# Altium PCB Hexapod_PCB.PcbDoc (part 2 of 2)
Units mm, origin at the board's own origin, x right, y up, seen from the top; angles counter-clockwise.
Board outline 100 x 100 mm, 4 copper layers (Top Layer, GND Layer, PWR Layer, Bottom Layer), stack 1.483 mm thick; 251 components, 159 nets, 831 pads, 257 vias.
Unrouted connection lines stored in the file: 253.
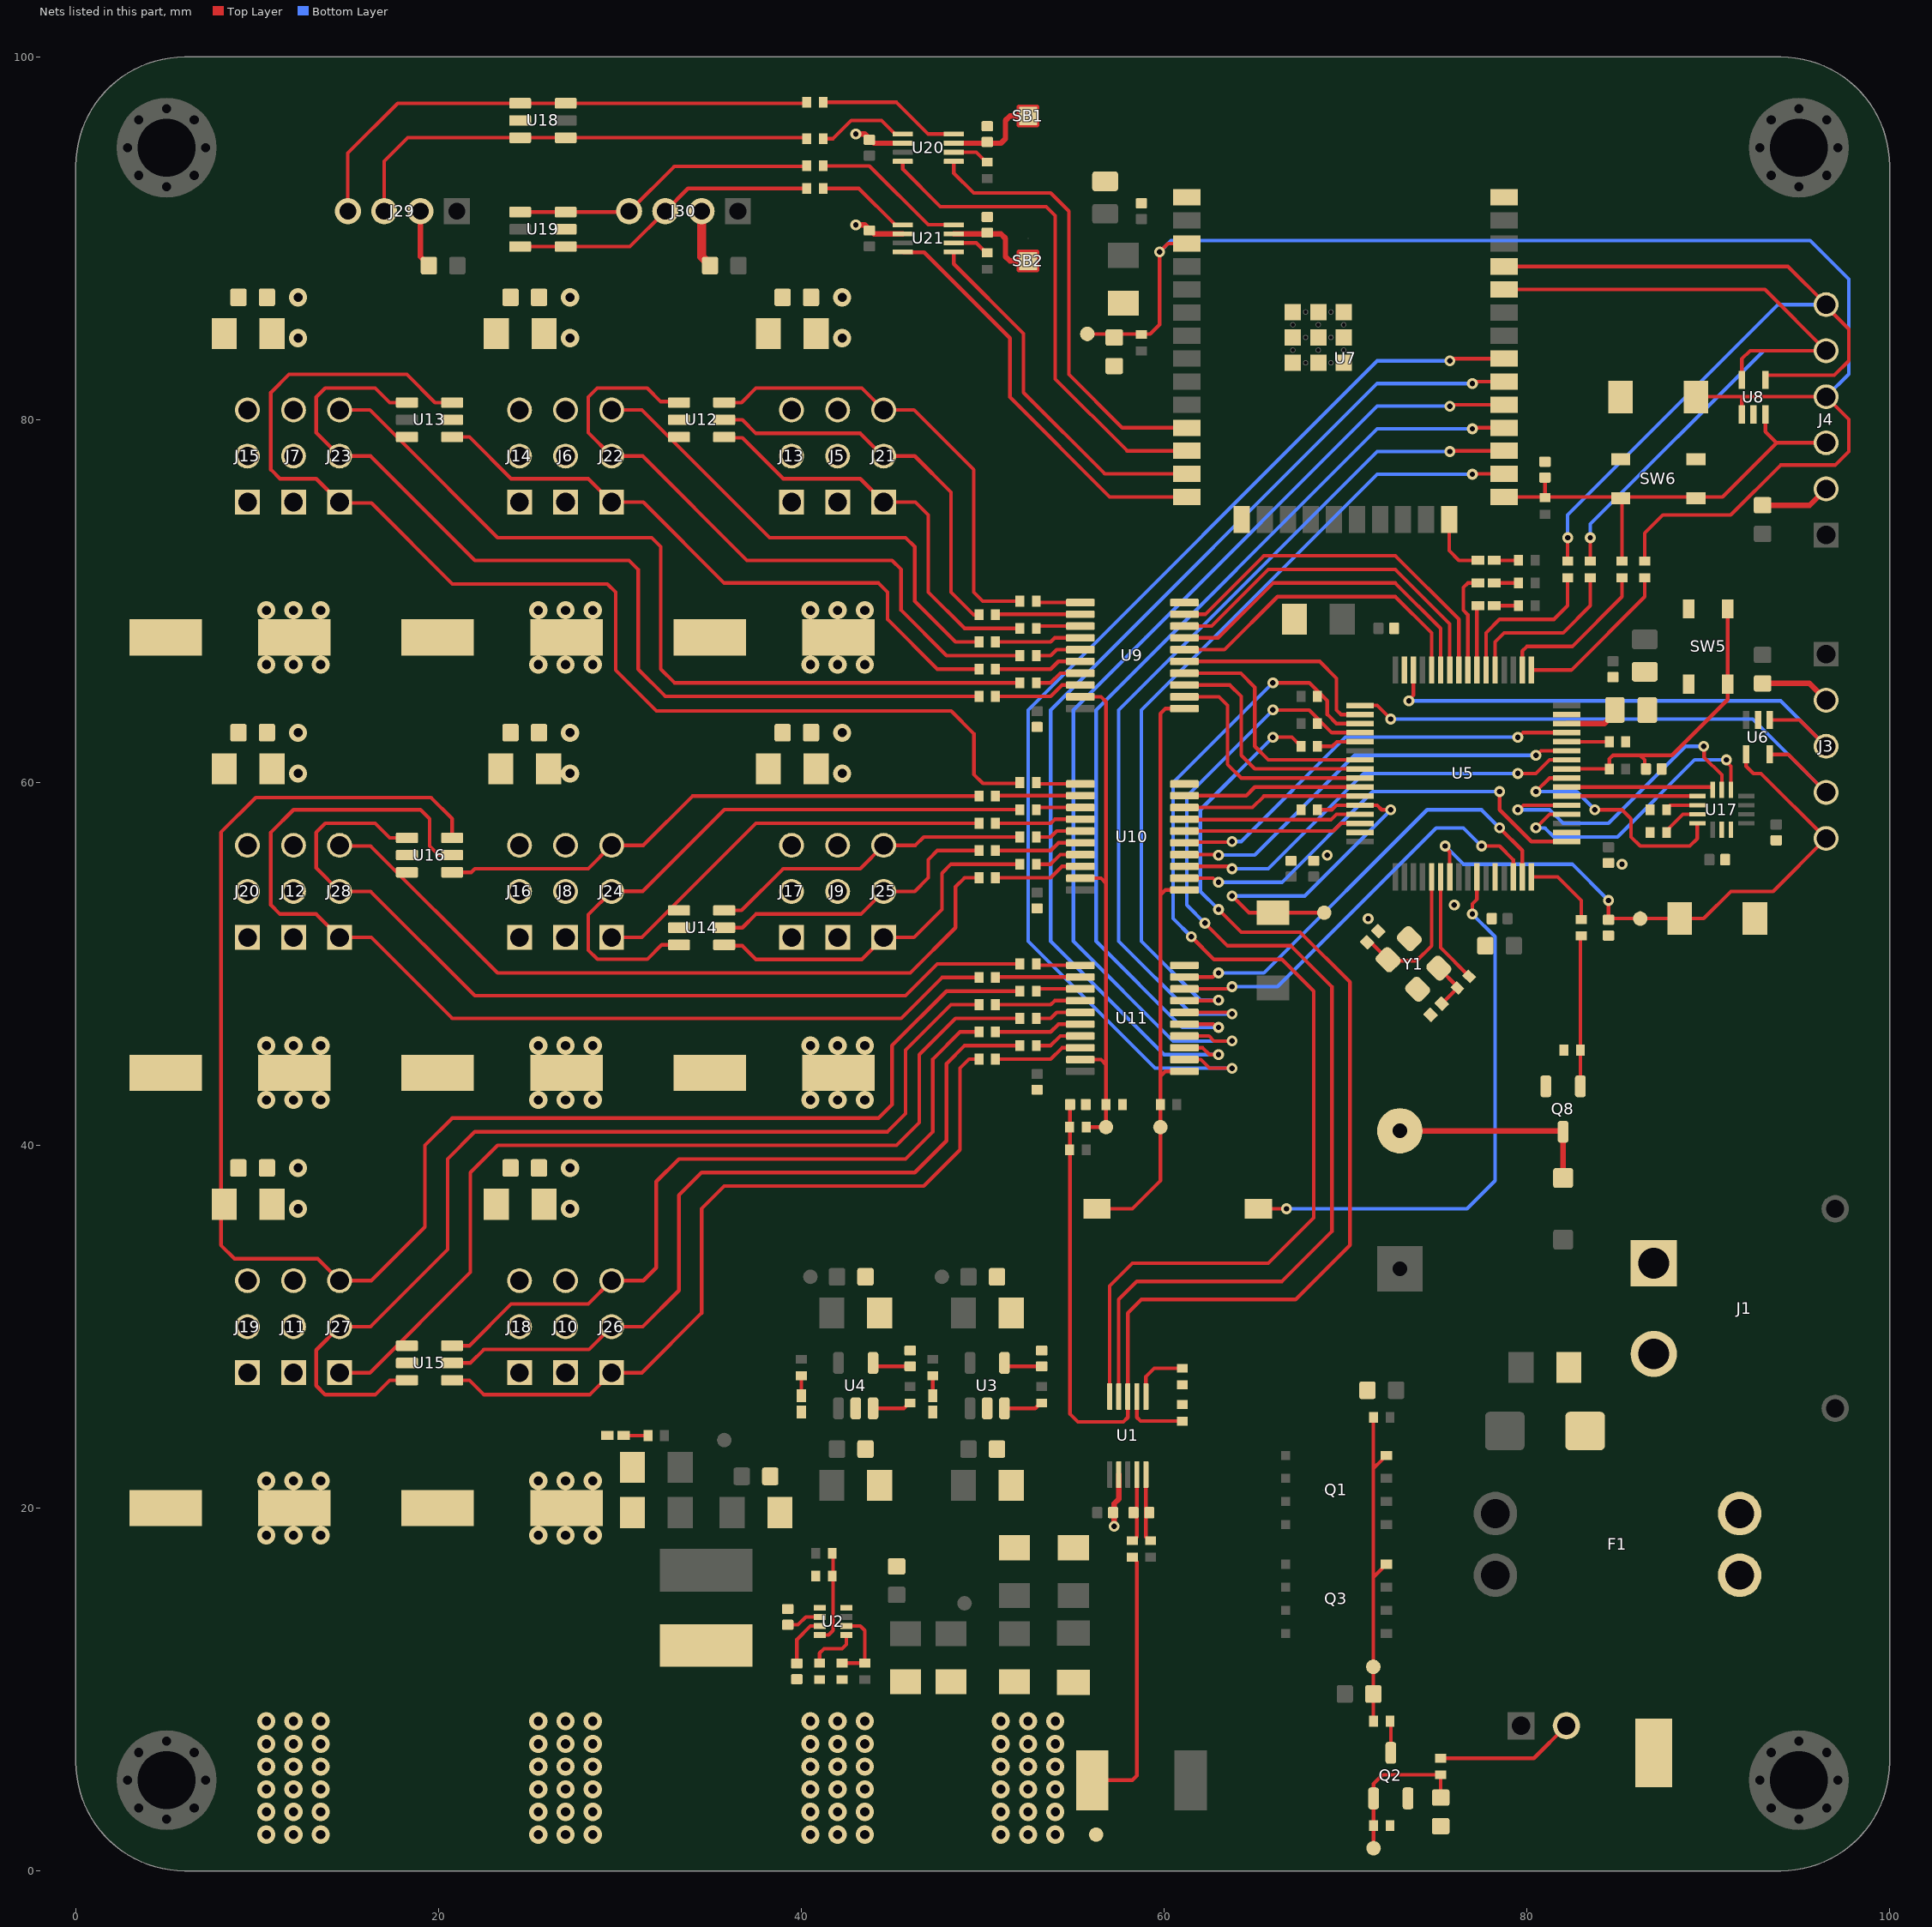
[diagram p2: the nets of this part, all layers, seen from the top]

## Via types
v1: diameter 1, hole 0.5, Top Layer to Bottom Layer, tented both sides, 136 vias
v2: diameter 0.6, hole 0.3, Top Layer to Bottom Layer, tented both sides, 69 vias
v3: diameter 0.6, hole 0.3, Top Layer to Bottom Layer, 43 vias
v4: diameter 1, hole 0.5, Top Layer to Bottom Layer, 9 vias

## Nets (pads, with @x,y where several pads share a name; then routed paths per layer and width w, separated by ;. In a path a pad name is that pad's centre, name@x,y a point inside that pad or via, vN(x,y) a via of type N, cw(c..) or ccw(c..) an arc to the next point about the centre after c; other vN are vias at no path point) (continued)
+VBAT_SYS: C47.1 C48.2 C49.2 C50.1 C51.2 C52.2 C53.1 C54.2 C55.2 C56.1 C57.2 C58.2 C59.1 C60.2 C61.2 C62.1 C63.2 C64.2 C65.1 C66.2 C67.2 C68.1 C69.2 C70.2 FB1.1 J5.1 J5.2 J5.3 J6.1 J6.2 J6.3 J7.1 J7.2 J7.3 J8.1 J8.2 J8.3 J9.1 J9.2 J9.3 J10.1 J10.2 J10.3 J11.1 J11.2 J11.3 J12.1 J12.2 J12.3 R10.1 R12.2 TP4.TP | length 14.8
  Top Layer w0.2: R10.1@56.032,5 58.25,5 58.5,5.25 58.5,17.045 58.45,17.095 58.45,17.15 58.305,17.295 R12.2@58.25,17.295
  other v1: 10.5,2 12,2 13.5,2 25.5,2 27,2 28.5,2 40.5,2 42,2 43.5,2 51,2 52.5,2 54,2 10.5,3.25 12,3.25 13.5,3.25 25.5,3.25 27,3.25 28.5,3.25 40.5,3.25 42,3.25 43.5,3.25 51,3.25 52.5,3.25 54,3.25 10.5,4.5 12,4.5 13.5,4.5 25.5,4.5 27,4.5 28.5,4.5 40.5,4.5 42,4.5 43.5,4.5 51,4.5 52.5,4.5 54,4.5 10.5,5.75 12,5.75 13.5,5.75 25.5,5.75 27,5.75 28.5,5.75 40.5,5.75 42,5.75 43.5,5.75 51,5.75 52.5,5.75 54,5.75 10.5,7 12,7 13.5,7 25.5,7 27,7 28.5,7 40.5,7 42,7 43.5,7 51,7 52.5,7 54,7 10.5,8.25 12,8.25 13.5,8.25 25.5,8.25 27,8.25 28.5,8.25 40.5,8.25 42,8.25 43.5,8.25 51,8.25 52.5,8.25 54,8.25 10.5,18.5 12,18.5 13.5,18.5 25.5,18.5 27,18.5 28.5,18.5 10.5,21.5 12,21.5 13.5,21.5 25.5,21.5 27,21.5 28.5,21.5 12.25,36.5 27.25,36.5 12.25,38.75 27.25,38.75 10.5,42.5 12,42.5 13.5,42.5 25.5,42.5 27,42.5 28.5,42.5 40.5,42.5 42,42.5 43.5,42.5 10.5,45.5 12,45.5 13.5,45.5 25.5,45.5 27,45.5 28.5,45.5 40.5,45.5 42,45.5 43.5,45.5 12.25,60.5 27.25,60.5 42.25,60.5 12.25,62.75 27.25,62.75 42.25,62.75 10.5,66.5 12,66.5 13.5,66.5 25.5,66.5 27,66.5 28.5,66.5 40.5,66.5 42,66.5 43.5,66.5 10.5,69.5 12,69.5 13.5,69.5 25.5,69.5 27,69.5 28.5,69.5 40.5,69.5 42,69.5 43.5,69.5 12.25,84.5 27.25,84.5 42.25,84.5 12.25,86.75 27.25,86.75 42.25,86.75
EN: C45.2 J4.4 R28.2 R29.1 SW3.2 TP11.TP U7.3 U8.1 | length 82.5
  Top Layer w0.2: TP11.TP@55.767,84.733 57.25,84.733 58.75,84.733 59.233,84.733 59.75,85.25 v2(59.75,89.25) 60.22,89.72 U7.3@61.25,89.72 ; R29.1@86.5,72.205 86.5,73.75 87.5,74.75 91.242,74.75 93.992,77.5 97,77.5 97.75,78.25 97.75,80.02 J4.4@96.5,81.27 92.02,81.27 ; SW3.2@89.325,81.25 89.345,81.27 92.02,81.27 ; U8.1@91.85,80.303 91.85,81.1 92.02,81.27
  Bottom Layer w0.2: v2(59.75,89.25) 60.382,89.882 95.618,89.882 97.75,87.75 97.75,82.52 J4.4@96.5,81.27
GND: C2.1 C3.1 C4.1 C5.1 C7.1 C9.1 C10.1 C11.1 C12.1 C13.1 C14.1 C15.1 C16.1 C17.2 C18.1 C19.1 C20.1 C21.1 C22.1 C23.1 C24.1 C25.1 C26.1 C27.1 C28.1 C29.1 C30.1 C31.1 C32.1 C33.1 C34.1 C35.1 C36.1 C37.1 C38.1 C39.1 C40.1 C41.1 C42.1 C43.1 C44.1 C45.1 C46.1 C47.2 C48.1 C49.1 C50.2 C51.1 C52.1 C53.2 C54.1 C55.1 C56.2 C57.1 C58.1 C59.2 C60.1 C61.1 C62.2 C63.1 C64.1 C65.2 C66.1 C67.1 C68.2 C69.1 C70.1 C71.1 C72.1 C73.1 C74.1 C75.1 C76.1 C77.1 C78.1 C79.1 C80.1 C81.1 C82.1 C83.1 C84.1 C85.1 D1.2 D2.1 D3.1 D4.1 J1.2 J3.2 J4.2 J13.1 J13.2 J13.3 J14.1 J14.2 J14.3 J15.1 J15.2 J15.3 J16.1 J16.2 J16.3 J17.1 J17.2 J17.3 J18.1 J18.2 J18.3 J19.1 J19.2 J19.3 J20.1 J20.2 J20.3 J29.2 J30.2 Q2.2 Q8.2 R4.2 R13.2 R14.2 R18.1 R19.1 R20.1 R25.2 R26.2 R34.2 R59.2 R60.2 R79.1 SW2.1 SW3.1 SW5.3 SW5.4 SW6.3 SW6.4 TP2.TP U1.7 U2.4 U3.2 U4.2 U5.12 U5.18 U5.31 U5.47 U5.63 U6.GND U7.1 U7.15 U7.38 U7.39_1 U7.39_2 U7.39_3 U7.39_4 U7.39_5 U7.39_6 U7.39_7 U7.39_8 U7.39_9 U8.GND U9.10 U10.10 U11.10 U12.2 U13.2 U14.2 U15.2 U16.2 U17.6 U17.7 U18.2 U19.2 U20.2 U21.2 Y1.2 Y1.4 | length 22.7
  Top Layer w0.3: J29.2@19,91.5 19,89 19.465,88.535 C76.1@19.465,88.5 ; v3(43,90.75) 43.5,90.75 44,90.25 U21.2@45.595,90.25 ; v3(43,95.75) 43.5,95.75 44,95.25 U20.2@45.595,95.25 ; v3(57.25,19) 57.25,20.25 57.5,20.5 U1.7@57.5,21.85 ; C36.1@93,65.465 95.575,65.465 J3.2@96.5,64.54 ; C46.1@93,75.285 95.595,75.285 J4.2@96.5,76.19
  Top Layer w0.5: J30.2@34.5,91.5 34.5,89 34.965,88.535 C77.1@34.965,88.5
  other v2: 71.25,52.5 76,53.25
  other v3: 85.25,55.5 69,56
IO0: C79.2 J4.3 R30.2 R74.2 SW6.1 SW6.2 U7.25 U8.2 | length 25.4
  Top Layer w0.2: U7.25@78.75,75.75 R74.2@80.955,75.75 ; C79.2@81,76.815 81,75.795 R74.2@80.955,75.75 ; SW6.2@85.175,75.675 85.25,75.6 R30.2@85.25,72.205 ; U8.2@93.15,80.303 U8.2@93.15,80.298 93.15,79.35 93.77,78.73 ; J4.3@96.5,78.73 93.77,78.73 ; R74.2@80.955,75.75 90.79,75.75 93.77,78.73
NetC1_1: C1.1 Q1.4 Q3.4 R1.1 R2.2 TP1.TP | length 18.8
  Top Layer w0.2: R1.1@71.535,8.33 C1.1@71.535,9.75 TP1.TP@71.535,11.25 71.535,16.185 ; R2.2@71.545,25 71.535,24.99 71.535,22.185 ; Q3.4@72.255,16.905 72.18,16.905 72.03,16.755 72.03,16.68 71.535,16.185 ; Q1.4@72.255,22.905 72.18,22.905 72.03,22.755 72.03,22.68 71.535,22.185 ; 71.535,16.185 71.535,22.185
NetC4_2: C4.2 Q2.1 R3.2 R4.1 TP3.TP | length 8.7
  Top Layer w0.2: TP3.TP@71.55,1.25 Q2.1@71.55,3.995 71.55,4.8 72.045,5.295 R3.2@75.25,5.295 C4.2@75.25,4.035
NetC6_1: C6.1 R12.1 U1.9 | length 3.8
  Top Layer w0.2: R12.1@58.25,18.205 58.305,18.205 58.5,18.4 U1.9@58.5,21.85
NetC6_2: C6.2 R8.1 U1.10 | length 3.8
  Top Layer w0.2: U1.10@59,21.85 59,18.4 59.195,18.205 R8.1@59.25,18.205
NetC7_2: C7.2 R5.1 R9.2 R11.1 U1.3 | length 76.8
  Top Layer w0.2: C7.2@54.815,42.25 54.815,41 54.815,39.75 54.815,25.185 55.25,24.75 57.75,24.75 58,25 U1.3@58,26.15 58,30.75 58.75,31.5 67.25,31.5 70.25,34.5 70.25,49 67.5,51.75 64.25,51.75 v2(63,53) ; v2(66,62.5) 67.045,62.5 67.345,62.2 67.4,62.2 67.545,62.055 R11.1@67.545,62
  Bottom Layer w0.2: v2(63,53) 62,54 62,58.5 v2(66,62.5)
NetC8_1: C8.1 L1.1 U2.5
NetC8_2: C8.2 U2.6 | length 1.9
  Top Layer w0.2: C8.2@39.25,13.565 39.815,13.565 40.25,14 U2.6@41.015,14
NetC17_1: C17.1 U2.7 | length 2.9
  Top Layer w0.2: C17.1@39.75,11.433 39.75,12.75 40.5,13.5 U2.7@41.015,13.5
NetC18_2: C18.2 U3.4 | length 2.1
  Top Layer w0.2: U3.4@51.2,28.005 51.39,27.815 C18.2@53.25,27.815
NetC23_2: C23.2 U4.4 | length 2.1
  Top Layer w0.2: U4.4@43.95,28.005 44.14,27.815 C23.2@46,27.815
NetC39_2: C39.2 U5.30 | length 3.1
  Top Layer w0.3: U5.30@82.2,63.25 84.275,63.25 84.855,63.83 C39.2@84.855,64
NetC40_2: C40.2 R27.1 Y1.1 | length 2.8
  Top Layer w0.2: Y1.1@75.147,49.77 76.178,48.738 R27.1@76.178,48.678 C40.2@75.308,47.808
NetC78_2: C78.2 R73.2 SW5.1 SW5.2 U5.25 | length 16.7
  Top Layer w0.2: U5.25@82.2,60.75 R73.2@84.545,60.75 84.545,61.295 84.75,61.5 86.25,61.5 ; C78.2@86.565,60.75 86.502,60.813 86.502,61.248 86.25,61.5 ; SW5.1@91.075,69.575 SW5.2@91.075,65.425 91.075,64.575 88,61.5 86.25,61.5
NetC81_2: C81.2 SB1.3 U20.7 | length 5.3
  Top Layer w0.3: U20.7@48.405,95.25 51,95.25 51.25,95.5 51.25,96.5 51.5,96.75 SB1.3@52.5,96.75
NetC83_2: C83.2 SB2.3 U21.7 | length 5.3
  Top Layer w0.3: U21.7@48.405,90.25 51,90.25 51.25,90 51.25,89 51.5,88.75 SB2.3@52.5,88.75
NetD2_2: D2.2 R15.1 | length 1.3
  Top Layer w0.2: D2.2@30.2,24 R15.1@31.545,24
NetD3_2: D3.2 R22.1 | length 1.1
  Top Layer w0.2: D3.2@47.25,26.2 R22.1@47.25,27.295
NetD4_2: D4.2 R24.1 | length 1.1
  Top Layer w0.2: D4.2@40,26.2 R24.1@40,27.295
NetD5_1: D5.1 U5.39 | length 3.6
  Top Layer w0.2: U5.39@77.25,66.2 77.25,69.7 D5.1@77.3,69.75
NetD5_2: D5.2 R75.2 | length 1.3
  Top Layer w0.2: D5.2@78.2,69.75 R75.2@79.545,69.75
NetD6_1: D6.1 U5.40 | length 5.6
  Top Layer w0.2: U5.40@76.75,66.2 76.75,69.25 76.5,69.5 76.5,70.75 76.75,71 D6.1@77.3,71
NetD6_2: D6.2 R76.2 | length 1.3
  Top Layer w0.2: D6.2@78.2,71 R76.2@79.545,71
NetD7_1: D7.1 U7.24 | length 3.5
  Top Layer w0.2: U7.24@75.715,74.5 75.715,72.785 76.25,72.25 D7.1@77.3,72.25
NetD7_2: D7.2 R77.2 | length 1.3
  Top Layer w0.2: D7.2@78.2,72.25 R77.2@79.545,72.25
NetD8_2: D8.2 LS1.N Q8.3 | length 11.6
  Top Layer w0.3: LS1.N@73,40.8 81.945,40.8 Q8.3@82,40.745 D8.2@82,38.2
NetF1_1: F1.1 J1.1
NetJ2_2: J2.2 R3.1 | length 7.7
  Top Layer w0.2: R3.1@75.25,6.205 80.387,6.205 J2.2@82.182,8
NetQ2_3: Q2.3 R1.2 | length 1.8
  Top Layer w0.2: R1.2@72.455,8.25 72.5,8.205 Q2.3@72.5,6.505
NetQ8_1: Q8.1 R78.1 R79.2 | length 8.3
  Top Layer w0.2: Q8.1@82.95,43.255 82.953,43.257 82.953,45.248 R79.2@82.955,45.25 82.955,51.5 R78.1@83,51.545
NetR6_1: R6.1 U1.5 U5.51 | length 62.3
  Top Layer w0.2: U1.5@57,26.15 57,32.25 58.25,33.5 65.75,33.5 68.25,36 68.25,48.5 66.5,50.25 62.75,50.25 v2(61.5,51.5) ; v2(66,65.5) 68,65.5 69,64.5 69,63.75 69.5,63.25 U5.51@70.8,63.25
  Bottom Layer w0.2: v2(61.5,51.5) 60.5,52.5 60.5,60 v2(66,65.5)
NetR7_1: R7.1 U1.4 U5.52 | length 60.1
  Top Layer w0.2: U1.4@57.5,26.15 57.5,31.5 58.5,32.5 66.5,32.5 69.25,35.25 69.25,48.75 67,51 63.5,51 v2(62.25,52.25) ; v2(66,64) 68,64 69.25,62.75 69.5,62.75 U5.52@70.8,62.75
  Bottom Layer w0.2: v2(62.25,52.25) 61.25,53.25 61.25,59.25 v2(66,64)
NetR9_1: R9.1 R34.1 TP13.TP U9.19 U10.19 U11.19 | length 29.1
  Top Layer w0.2: U11.19@55.38,44.725 56.525,44.725 56.795,44.455 ; U10.19@55.38,54.725 56.525,54.725 56.795,54.455 ; U9.19@55.38,64.725 56.525,64.725 56.795,64.455 56.795,54.455 ; R9.1@55.705,41 TP13.TP@56.795,41 R34.1@56.795,42.25 56.795,44.455 ; 56.795,44.455 56.795,54.455
NetR11_2: R11.2 U5.53 | length 2.4
  Top Layer w0.2: R11.2@68.455,62 69.275,62 69.525,62.25 U5.53@70.8,62.25
NetR13_1: R13.1 U1.2 | length 3.7
  Top Layer w0.2: U1.2@58.5,26.15 58.5,25 58.705,24.795 R13.1@61,24.795
NetR14_1: R14.1 U1.1 | length 3.3
  Top Layer w0.2: U1.1@59,26.15 59,27.25 59.455,27.705 R14.1@61,27.705
NetR16_1: R16.1 R19.2 U2.2 | length 4.2
  Top Layer w0.2: R19.2@42.25,11.455 R16.1@43.5,11.455 43.5,13.25 43.25,13.5 U2.2@42.485,13.5
NetR17_1: R17.1 R20.2 U2.8 | length 5.1
  Top Layer w0.2: U2.8@41.015,13 41.5,13 41.75,13.25 R17.1@41.75,17.5
NetR18_2: R18.2 U2.1 | length 2.7
  Top Layer w0.2: R18.2@41,11.455 41,12 41.25,12.25 42.25,12.25 42.485,12.485 U2.1@42.485,13
NetR21_2: R21.2 U3.3 | length 2.2
  Top Layer w0.2: U3.3@51.2,25.495 52.895,25.495 53.195,25.795 R21.2@53.25,25.795
NetR23_2: R23.2 U4.3 | length 2.2
  Top Layer w0.2: U4.3@43.95,25.495 45.645,25.495 45.945,25.795 R23.2@46,25.795
NetR25_1: R25.1 SW1.2 TP9.TP U5.60 | length 20.4
  Top Layer w0.2: v2(63.75,53.75) 64.675,52.825 SW1.2@66,52.825 TP9.TP@68.825,52.825 ; R25.1@68.455,58.5 69.25,58.5 69.5,58.75 U5.60@70.8,58.75 71.75,58.75 72,58.5 v3(72.5,58.5)
  Bottom Layer w0.2: v2(63.75,53.75) 67.75,53.75 v3(72.5,58.5)
NetR26_1: R26.1 U5.28 | length 2.3
  Top Layer w0.2: U5.28@82.2,62.25 R26.1@84.545,62.25
NetR29_2: R29.2 U5.33 | length 9
  Top Layer w0.2: U5.33@80.25,66.2 82.45,66.2 86.5,70.25 R29.2@86.5,71.295
NetR30_1: R30.1 U5.34 | length 8.8
  Top Layer w0.2: U5.34@79.75,66.2 79.75,67.25 80,67.5 82.5,67.5 85.25,70.25 R30.1@85.25,71.295
NetR31_2: R31.2 U5.38 | length 8.7
  Top Layer w0.2: U5.38@77.75,66.2 77.75,68.25 78.5,69 81.5,69 82.25,69.75 R31.2@82.25,71.295
NetR32_2: R32.2 U5.37 | length 9.2
  Top Layer w0.2: U5.37@78.25,66.2 78.25,67.75 78.75,68.25 82,68.25 83.5,69.75 R32.2@83.5,71.295
NetR33_2: R33.2 SW4.2 TP12.TP U9.1 U10.1 U11.1 | length 34.2
  Top Layer w0.2: SW4.2@56.3,36.5 58.25,36.5 59.795,38.045 TP12.TP@59.795,41 R33.2@59.795,42.25 59.795,43.795 ; U11.1@61.12,44.075 60.075,44.075 59.795,43.795 ; U10.1@61.12,54.075 60.075,54.075 59.795,53.795 ; U9.1@61.12,64.075 60.075,64.075 59.795,63.795 59.795,53.795 ; 59.795,43.795 59.795,53.795
NetR35_2: R35.2 U9.13 | length 2.5
  Top Layer w0.2: R35.2@52.955,68.5 53.08,68.625 U9.13@55.38,68.625
NetR36_2: R36.2 U9.16 | length 4.9
  Top Layer w0.2: R36.2@50.705,66.25 53.75,66.25 54.175,66.675 U9.16@55.38,66.675
NetR37_2: R37.2 U9.12 | length 4.7
  Top Layer w0.2: R37.2@50.705,69.25 50.73,69.275 U9.12@55.38,69.275
NetR38_2: R38.2 U9.15 | length 2.6
  Top Layer w0.2: R38.2@52.955,67 53.75,67 54.075,67.325 U9.15@55.38,67.325
NetR39_2: R39.2 U9.11 | length 2.5
  Top Layer w0.2: R39.2@52.955,70 53.03,69.925 U9.11@55.38,69.925
NetR40_2: R40.2 U9.14 | length 4.8
  Top Layer w0.2: R40.2@50.705,67.75 53.75,67.75 53.975,67.975 U9.14@55.38,67.975
NetR41_2: R41.2 U10.11 | length 2.5
  Top Layer w0.2: R41.2@52.955,60 53.03,59.925 U10.11@55.38,59.925
NetR42_2: R42.2 U10.14 | length 4.8
  Top Layer w0.2: R42.2@50.705,57.75 53.75,57.75 53.975,57.975 U10.14@55.38,57.975
NetR43_2: R43.2 U9.18 | length 4.9
  Top Layer w0.2: R43.2@50.705,64.75 53.75,64.75 54.375,65.375 U9.18@55.38,65.375
NetR44_2: R44.2 U10.13 | length 2.5
  Top Layer w0.2: R44.2@52.955,58.5 53.08,58.625 U10.13@55.38,58.625
NetR45_2: R45.2 U9.17 | length 2.6
  Top Layer w0.2: R45.2@52.955,65.5 53.75,65.5 54.275,66.025 U9.17@55.38,66.025
NetR46_2: R46.2 U10.12 | length 4.7
  Top Layer w0.2: R46.2@50.705,59.25 50.73,59.275 U10.12@55.38,59.275
NetR47_2: R47.2 U10.17 | length 2.6
  Top Layer w0.2: R47.2@52.955,55.5 53.75,55.5 54.275,56.025 U10.17@55.38,56.025
NetR48_2: R48.2 U11.18 | length 4.9
  Top Layer w0.2: R48.2@50.705,44.75 53.75,44.75 54.375,45.375 U11.18@55.38,45.375
NetR49_2: R49.2 U10.16 | length 4.6
  Top Layer w0.2: 50.955,56.25 53.75,56.25 54.175,56.675 U10.16@55.38,56.675
NetR50_2: R50.2 U11.17 | length 2.6
  Top Layer w0.2: R50.2@52.955,45.5 53.75,45.5 54.275,46.025 U11.17@55.38,46.025
NetR51_2: R51.2 U10.15 | length 2.6
  Top Layer w0.2: R51.2@52.955,57 53.75,57 54.075,57.325 U10.15@55.38,57.325
NetR52_2: R52.2 U11.16 | length 4.9
  Top Layer w0.2: R52.2@50.705,46.25 53.75,46.25 54.175,46.675 U11.16@55.38,46.675
NetR53_2: R53.2 U11.15 | length 2.6
  Top Layer w0.2: R53.2@52.955,47 53.75,47 54.075,47.325 U11.15@55.38,47.325
NetR54_2: R54.2 U11.12 | length 4.7
  Top Layer w0.2: R54.2@50.705,49.25 50.73,49.275 U11.12@55.38,49.275
NetR55_2: R55.2 U11.14 | length 4.8
  Top Layer w0.2: R55.2@50.705,47.75 53.75,47.75 53.975,47.975 U11.14@55.38,47.975
NetR56_2: R56.2 U11.11 | length 2.5
  Top Layer w0.2: R56.2@52.955,50 53.03,49.925 U11.11@55.38,49.925
NetR57_2: R57.2 U11.13 | length 2.5
  Top Layer w0.2: R57.2@52.955,48.5 53.08,48.625 U11.13@55.38,48.625
NetR58_2: R58.2 U10.18 | length 4.9
  Top Layer w0.2: R58.2@50.705,54.75 53.75,54.75 54.375,55.375 U10.18@55.38,55.375
NetR59_1: R59.1 U17.3 | length 2.2
  Top Layer w0.2: R59.1@87.66,57.305 87.705,57.305 87.85,57.45 87.85,57.495 88.605,58.25 U17.3@89.4,58.25
NetR60_1: R60.1 U17.2 | length 1.8
  Top Layer w0.2: R60.1@87.66,58.555 87.705,58.555 87.9,58.75 U17.2@89.4,58.75
NetR61_2: R61.2 U20.6 | length 2.1
  Top Layer w0.2: U20.6@48.405,94.75 49.65,94.75 50.195,94.205 R61.2@50.25,94.205
NetR62_1: R62.1 U20.8 | length 7.9
  Top Layer w0.2: R62.1@41.205,97.5 45.25,97.5 47,95.75 U20.8@48.405,95.75
NetR63_2: R63.2 U20.1 | length 5.1
  Top Layer w0.2: R63.2@41.205,95.5 41.75,95.5 42.75,96.5 44.42,96.5 45.17,95.75 U20.1@45.595,95.75
NetR64_2: R64.2 U21.6 | length 2.1
  Top Layer w0.2: U21.6@48.405,89.75 49.65,89.75 50.195,89.205 R64.2@50.25,89.205
NetR65_1: R65.1 U21.8 | length 8.5
  Top Layer w0.2: R65.1@41.205,94 43.75,94 47,90.75 U21.8@48.405,90.75
NetR66_1: R66.1 U21.1 | length 5.2
  Top Layer w0.2: R66.1@41.205,92.75 43.17,92.75 45.17,90.75 U21.1@45.595,90.75
NetR78_2: R78.2 U5.16 | length 4.3
  Top Layer w0.2: U5.16@80.25,54.8 81.7,54.8 83,53.5 R78.2@83,52.455
NetSW4_1: SW4.1 U5.10 | length 31.1
  Top Layer w0.2: SW4.1@65.2,36.5 v2(66.75,36.5) ; v2(77,52.75) 77,53.316 77.25,53.566 U5.10@77.25,54.8
  Bottom Layer w0.2: v2(66.75,36.5) 76.7,36.5 78.25,38.05 78.25,51.5 v2(77,52.75)
NetU5_14: U5.14 U11.8 | length 23.5
  Top Layer w0.2: U11.8@61.12,48.625 63.517,48.625 63.642,48.75 v2(63.75,48.75) ; v2(77.5,56.5) 78.5,56.5 79.25,55.75 U5.14@79.25,54.8
  Bottom Layer w0.2: v2(63.75,48.75) 66.25,48.75 75,57.5 76.5,57.5 v2(77.5,56.5)
NetU5_15: U5.15 U11.9 | length 24.8
  Top Layer w0.2: U11.9@61.12,49.275 62.683,49.275 62.908,49.5 v2(63,49.5) ; v2(78.5,57.5) 79.75,56.25 U5.15@79.75,54.8
  Bottom Layer w0.2: v2(63,49.5) 65.5,49.5 74.5,58.5 77.5,58.5 v2(78.5,57.5)
NetU5_17: U5.17 U10.2 | length 25
  Top Layer w0.2: U10.2@61.12,54.725 62.695,54.725 62.92,54.5 v2(63,54.5) ; v2(78.5,59.5) 78.5,58.5 80.25,56.75 U5.17@82.2,56.75
  Bottom Layer w0.2: v2(63,54.5) 66.5,54.5 71.5,59.5 v2(78.5,59.5)
NetU5_20: U5.20 U17.12 | length 16.2
  Top Layer w0.2: v2(80.5,57.5) 81.25,58.25 U5.20@82.2,58.25 ; v2(91,61.25) 91,61.142 91.25,60.892 U17.12@91.25,59.6
  Bottom Layer w0.2: v2(80.5,57.5) 81,57.5 81.5,57 85,57 89.25,61.25 v2(91,61.25)
NetU5_21: U5.21 U17.13 | length 17.9
  Top Layer w0.2: v2(79.5,58.5) 79.566,58.5 79.816,58.75 U5.21@82.2,58.75 ; v2(89.75,62) 89.771,61.979 89.771,61.4 90.75,60.421 U17.13@90.75,59.6
  Bottom Layer w0.2: v2(79.5,58.5) 81.25,58.5 82,57.75 84.5,57.75 88.75,62 v2(89.75,62)
NetU5_22: U5.22 U17.1 | length 7.2
  Top Layer w0.2: U5.22@82.2,59.25 U17.1@89.4,59.25
NetU5_23: U5.23 U17.14 | length 8.2
  Top Layer w0.2: U5.23@82.2,59.75 90.225,59.75 90.25,59.725 U17.14@90.25,59.6
NetU5_24: U5.24 U17.4 | length 13.7
  Top Layer w0.2: v2(80.5,59.5) 81.25,60.25 U5.24@82.2,60.25 ; v2(83.75,58.5) 85.25,58.5 85.75,58 85.75,57 86.25,56.5 88.988,56.5 89.4,56.912 U17.4@89.4,57.75
  Bottom Layer w0.2: v2(80.5,59.5) 82.75,59.5 v2(83.75,58.5)
NetU5_26: U5.26 U10.3 | length 23.6
  Top Layer w0.2: U10.3@61.12,55.375 63.503,55.375 63.628,55.25 v2(63.75,55.25) ; v2(79.5,60.5) 80.5,60.5 81.25,61.25 U5.26@82.2,61.25
  Bottom Layer w0.2: v2(63.75,55.25) 65.75,55.25 71,60.5 v2(79.5,60.5)
NetU5_27: U5.27 U10.4 | length 23.5
  Top Layer w0.2: U10.4@61.12,56.025 62.975,56.025 v2(63,56) ; v2(80.5,61.5) 80.53,61.5 80.78,61.75 U5.27@82.2,61.75
  Bottom Layer w0.2: v2(63,56) 65,56 70.5,61.5 v2(80.5,61.5)
NetU5_29: U5.29 U10.5 | length 23.6
  Top Layer w0.2: U10.5@61.12,56.675 61.158,56.713 63.712,56.713 v2(63.75,56.75) ; v2(79.5,62.5) 79.53,62.5 79.78,62.75 U5.29@82.2,62.75
  Bottom Layer w0.2: v2(63.75,56.75) 64.25,56.75 70,62.5 v2(79.5,62.5)
NetU5_41: U5.41 U9.9 | length 20.7
  Top Layer w0.2: U9.9@61.12,69.275 62.275,69.275 65.5,72.5 72.75,72.5 76.25,69 U5.41@76.25,66.2
NetU5_42: U5.42 U9.8 | length 19.7
  Top Layer w0.2: U9.8@61.12,68.625 62.625,68.625 65.75,71.75 72.75,71.75 75.75,68.75 U5.42@75.75,66.2
NetU5_43: U5.43 U9.7 | length 18.7
  Top Layer w0.2: U9.7@61.12,67.975 62.975,67.975 66,71 72.75,71 75.25,68.5 U5.43@75.25,66.2
NetU5_44: U5.44 U9.6 | length 17.7
  Top Layer w0.2: U9.6@61.12,67.325 63.325,67.325 66.25,70.25 72.75,70.25 74.75,68.25 U5.44@74.75,66.2
NetU5_50: U5.50 U9.5 | length 11.9
  Top Layer w0.2: U9.5@61.12,66.675 68.575,66.675 69.5,65.75 69.5,64 69.75,63.75 70,63.75 U5.50@70.8,63.75
NetU5_55: U5.55 U9.4 | length 13.6
  Top Layer w0.2: U9.4@61.12,66.025 64.225,66.025 65,65.25 65,62 65.75,61.25 U5.55@70.8,61.25
NetU5_56: U5.56 U9.3 | length 13.5
  Top Layer w0.2: U9.3@61.12,65.375 63.625,65.375 64.25,64.75 64.25,61.5 65,60.75 U5.56@70.8,60.75
NetU5_57: U5.57 U9.2 | length 13.4
  Top Layer w0.2: U9.2@61.12,64.725 63.025,64.725 63.5,64.25 63.5,61 64.25,60.25 U5.57@70.8,60.25
NetU5_58: U5.58 U10.9 | length 9.9
  Top Layer w0.2: U10.9@61.12,59.275 64.525,59.275 65,59.75 U5.58@70.8,59.75
NetU5_59: U5.59 U10.8 | length 9.9
  Top Layer w0.2: U10.8@61.12,58.625 64.875,58.625 65.5,59.25 U5.59@70.8,59.25
NetU5_61: U5.61 U10.7 | length 9.8
  Top Layer w0.2: U10.7@61.12,57.975 61.145,57.95 69.2,57.95 69.5,58.25 U5.61@70.8,58.25
NetU5_62: U5.62 U10.6 | length 9.9
  Top Layer w0.2: U10.6@61.12,57.325 69.325,57.325 69.75,57.75 U5.62@70.8,57.75
NetU7_11: U7.11 U20.5 | length 24.6
  Top Layer w0.2: U20.5@48.405,94.25 48.405,93.595 49.5,92.5 53.75,92.5 54.75,91.5 54.75,82.5 57.69,79.56 U7.11@61.25,79.56
NetU7_12: U7.12 U20.4 | length 27.8
  Top Layer w0.2: U20.4@45.595,94.25 45.595,93.815 47.66,91.75 53.5,91.75 54,91.25 54,82.25 57.96,78.29 U7.12@61.25,78.29
NetU7_13: U7.13 U21.5 | length 20.2
  Top Layer w0.2: U21.5@48.405,89.25 48.405,88.595 52.25,84.75 52.25,81.5 56.73,77.02 U7.13@61.25,77.02
NetU7_14: U7.14 U21.4 | length 23.2
  Top Layer w0.2: U21.4@45.595,89.25 45.617,89.228 46.772,89.228 51.5,84.5 51.5,81.25 57,75.75 U7.14@61.25,75.75
NetU7_26: U7.26 U11.7 | length 45.6
  Top Layer w0.2: U11.7@61.122,47.977 62.973,47.977 v2(63,48) ; v2(77,77) 77.02,77.02 U7.26@78.75,77.02
  Bottom Layer w0.2: v2(63,48) 62,48 58.75,51.25 58.75,64 71.75,77 v2(77,77)
NetU7_27: U7.27 U11.6 | length 50.5
  Top Layer w0.2: U11.6@61.134,47.325 63.689,47.325 v2@63.75,47.264 ; v2(75.75,78.25) 75.79,78.29 U7.27@78.75,78.29
  Bottom Layer w0.2: v2(63.75,47.25) 61.5,47.25 57.5,51.25 57.5,64 71.75,78.25 v2(75.75,78.25)
NetU7_28: U7.28 U11.5 | length 52.4
  Top Layer w0.2: U11.5@61.12,46.675 62.717,46.675 62.892,46.5 v2(63,46.5) ; v2(77,79.5) 77.06,79.56 U7.28@78.75,79.56
  Bottom Layer w0.2: v2(63,46.5) 61,46.5 56.25,51.25 56.25,64 71.75,79.5 v2(77,79.5)
NetU7_29: U7.29 U11.4 | length 57.2
  Top Layer w0.2: U11.4@61.12,46.025 62.475,46.025 62.75,45.75 v2(63.75,45.75) ; v2(75.75,80.75) 75.858,80.75 75.938,80.83 U7.29@78.75,80.83
  Bottom Layer w0.2: v2(63.75,45.75) 60.5,45.75 55,51.25 55,64 59,68 71.75,80.75 v2(75.75,80.75)
NetU7_30: U7.30 U11.3 | length 59.1
  Top Layer w0.2: U11.3@61.12,45.375 62.125,45.375 62.5,45 v2(63,45) ; v2(77,82) 77.108,82 77.208,82.1 U7.30@78.75,82.1
  Bottom Layer w0.2: v2(63,45) 60,45 53.75,51.25 53.75,64 71.75,82 v2(77,82)
NetU7_31: U7.31 U11.2 | length 64
  Top Layer w0.2: U11.2@61.12,44.725 62.025,44.725 62.5,44.25 v2(63.75,44.25) ; v2@75.76,83.25 75.858,83.25 75.978,83.37 U7.31@78.75,83.37
  Bottom Layer w0.2: v2(63.75,44.25) 59.5,44.25 52.5,51.25 52.5,64 71.75,83.25 v2(75.75,83.25)
NRST: C35.2 J3.5 SW2.2 TP10.TP U5.7 U6.3 | length 33.7
  Top Layer w0.2: v2(75.5,56.5) 75.5,56.434 75.75,56.184 U5.7@75.75,54.8 ; v2(84.5,53.5) C35.2@84.5,52.435 84.565,52.5 TP10.TP@86.25,52.5 SW2.2@88.425,52.5 89.75,52.5 91.25,54 93.58,54 J3.5@96.5,56.92 ; U6.3@92.091,61.543 92.091,60.9 92.491,60.5 92.911,60.5 J3.5@96.491,56.92
  Bottom Layer w0.2: v2(75.5,56.5) 76.5,55.5 82.5,55.5 v2(84.5,53.5)
OSC_IN: C41.2 U5.5 Y1.3 | length 8
  Top Layer w0.2: C41.2@71.192,51.192 71.391,51.192 Y1.3@72.353,50.23 ; Y1.3@72.406,50.177 73.927,50.177 74.75,51 U5.5@74.75,54.8
OSC_OUT: R27.2 U5.6 | length 6.1
  Top Layer w0.2: U5.6@75.25,54.8 75.25,50.893 R27.2@76.822,49.322
PE_RX_EXT: J30.3 R66.2 U19.1 U19.6 | length 17.1
  Top Layer w0.2: U19.6@24.495,89.55 U19.1@27.005,89.55 30.55,89.55 J30.3@32.5,91.5 33.75,92.75 R66.2@40.295,92.75
PE_SCL_EXT: J29.4 R62.2 U18.1 U18.6 | length 29.7
  Top Layer w0.2: J29.4@14.993,91.507 14.993,94.7 17.743,97.45 U18.1@24.495,97.45 U18.6@27.005,97.45 40.245,97.45 R62.2@40.295,97.5
PE_SDA_EXT: J29.3 R63.1 U18.3 U18.4 | length 26.6
  Top Layer w0.2: J29.3@17,91.5 17,94.25 18.3,95.55 U18.3@24.495,95.55 U18.4@27.005,95.55 40.245,95.55 R63.1@40.295,95.5
PE_TX_EXT: J30.4 R65.2 U19.3 U19.4 | length 16.9
  Top Layer w0.2: U19.4@24.495,91.45 30.45,91.45 J30.4@30.5,91.5 30.521,91.5 32.996,93.975 40.27,93.975 R65.2@40.295,94
RXD0: J4.5 R32.1 U7.34 U8.4 | length 44.1
  Top Layer w0.2: U7.34@78.75,87.18 93.13,87.18 J4.5@96.5,83.81 92.31,83.81 91.85,83.35 U8.4@91.85,82.203 ; R32.1@83.5,72.205 v2(83.5,73.5)
  Bottom Layer w0.2: v2(83.5,73.5) 83.5,74.25 93.06,83.81 J4.5@96.5,83.81
SERVO_EXT_1: J23.2 R43.1 U13.4 | length 53.3
  Top Layer w0.2: U13.4@18.255,80.95 17.3,80.95 16.5,81.75 13.75,81.75 13.25,81.25 13.25,79.29 J23.2@14.54,78 16.25,78 22,72.25 30.5,72.25 31,71.75 31,66.25 32.5,64.75 R43.1@49.795,64.75
SERVO_EXT_2: J23.3 R45.1 U13.6 | length 47.7
  Top Layer w0.2: J23.3@14.54,80.54 16.21,80.54 17.818,78.933 23.25,73.5 31.75,73.5 32.25,73 32.25,66.25 33,65.5 R45.1@52.045,65.5
SERVO_EXT_3: J22.1 R36.1 U13.1 | length 35.2
  Top Layer w0.2: U13.1@20.745,79.05 21.7,79.05 24,76.75 28.25,76.75 J22.1@29.54,75.46 31.29,75.46 35.75,71 44.25,71 44.75,70.5 44.75,69 47.5,66.25 R36.1@49.795,66.25
SERVO_EXT_4: J22.2 R38.1 U12.1 | length 37.7
  Top Layer w0.2: U12.1@33.255,80.95 33.205,81 32.25,81 31.5,81.75 28.75,81.75 28.25,81.25 28.25,79.29 J22.2@29.54,78 31.25,78 37,72.25 45,72.25 45.5,71.75 45.5,69.5 48,67 R38.1@52.045,67
SERVO_EXT_5: J22.3 R40.1 U12.3 | length 27.3
  Top Layer w0.2: J22.3@29.54,80.54 31.21,80.54 32.818,78.932 38.25,73.5 45.75,73.5 46.25,73 46.25,70 48.5,67.75 R40.1@49.795,67.75
SERVO_EXT_6: J21.1 R35.1 U12.4 | length 23.2
  Top Layer w0.2: U12.4@35.745,79.05 35.795,79 36.75,79 39,76.75 43.25,76.75 J21.1@44.54,75.46 46.29,75.46 47,74.75 47,70.5 49,68.5 R35.1@52.045,68.5
SERVO_EXT_7: J21.2 R37.1 U12.5 | length 21.7
  Top Layer w0.2: U12.5@35.745,80 36.75,80 37.5,79.25 43.25,79.25 44.5,78 J21.2@44.54,78 46.25,78 48.25,76 48.25,70.5 49.5,69.25 R37.1@49.795,69.25
SERVO_EXT_8: J21.3 R39.1 U12.6 | length 25.5
  Top Layer w0.2: U12.6@35.745,80.95 36.7,80.95 37.5,81.75 43.33,81.75 J21.3@44.54,80.54 46.21,80.54 49.5,77.25 49.5,70.5 50,70 R39.1@52.045,70
SERVO_EXT_9: J28.3 R58.1 U16.3 | length 41.7
  Top Layer w0.2: J28.3@14.54,56.54 14.58,56.5 16.25,56.5 23.25,49.5 46,49.5 48.5,52 48.5,54.25 49,54.75 R58.1@49.795,54.75
SERVO_EXT_10: J25.1 R47.1 U14.4 | length 20
  Top Layer w0.2: U14.4@35.745,51.05 35.795,51 36.75,51 37.5,50.25 43.33,50.25 J25.1@44.54,51.46 46.21,51.46 47.75,53 47.75,55 48.25,55.5 R47.1@52.045,55.5
SERVO_EXT_11: J25.2 R49.1 U14.5 | length 16.4
  Top Layer w0.2: U14.5@35.745,52 36.75,52 37.5,52.75 43.29,52.75 J25.2@44.54,54 46.25,54 47,54.75 47,55.75 47.5,56.25 R49.1@49.795,56.25
SERVO_EXT_12: J25.3 R51.1 U14.6 | length 18
  Top Layer w0.2: U14.6@35.745,52.95 36.7,52.95 39,55.25 43.25,55.25 J25.3@44.54,56.54 46.29,56.54 46.75,57 R51.1@52.045,57
SERVO_EXT_13: J24.1 R42.1 U14.1 | length 22.9
  Top Layer w0.2: J24.1@29.54,51.46 31.21,51.46 37.5,57.75 R42.1@49.795,57.75
SERVO_EXT_14: J24.2 R44.1 U14.3 | length 33.7
  Top Layer w0.2: J24.2@29.54,54 28.256,52.716 28.256,50.756 28.756,50.256 31.506,50.256 32.306,51.056 U14.3@33.249,51.056 ; J24.2@29.546,54.006 31.256,54.006 35.756,58.506 R44.1@52.039,58.506
SERVO_EXT_15: J24.3 R46.1 U16.4 | length 30.8
  Top Layer w0.2: U16.4@20.745,55.05 21.8,55.05 22,55.25 28.25,55.25 J24.3@29.54,56.54 31.29,56.54 34,59.25 R46.1@49.795,59.25
SERVO_EXT_16: J23.1 R41.1 U13.3 | length 67.5
  Top Layer w0.2: J23.1@14.54,75.46 13.25,76.75 11.25,76.75 10.75,77.25 10.75,81.5 11.75,82.5 18.25,82.5 19.8,80.95 U13.3@20.745,80.95 ; J23.1@14.59,75.41 16.3,75.41 20.76,70.95 29.3,70.95 29.76,70.49 29.76,66.2 32.01,63.95 48.26,63.95 49.51,62.7 49.51,60.45 50.01,59.95 51.995,59.95 R41.1@52.045,60
SERVO_EXT_17: J26.1 R48.1 U15.4 | length 43
  Top Layer w0.2: U15.4@20.745,27.05 21.7,27.05 22.5,26.25 28.33,26.25 J26.1@29.54,27.46 31.21,27.46 34.5,30.75 34.5,36.5 35.75,37.75 46.75,37.75 48.75,39.75 48.75,44.25 49.25,44.75 R48.1@49.795,44.75
SERVO_EXT_18: J26.2 R50.1 U15.5 | length 44.1
  Top Layer w0.2: U15.5@20.745,28 21.75,28 22.5,28.75 28.29,28.75 J26.2@29.54,30 31.25,30 33.25,32 33.25,37.25 34.5,38.5 46.25,38.5 48,40.25 48,44.5 49,45.5 R50.1@52.045,45.5
SERVO_EXT_19: J26.3 R52.1 U15.6 | length 41.3
  Top Layer w0.2: U15.6@20.745,28.95 21.7,28.95 24,31.25 28.25,31.25 J26.3@29.54,32.54 31.29,32.54 32,33.25 32,38 33.25,39.25 45.75,39.25 47.25,40.75 47.25,44.75 48.75,46.25 R52.1@49.795,46.25
SERVO_EXT_20: J27.1 R53.1 U15.1 | length 51
  Top Layer w0.2: J27.1@14.54,27.46 16.21,27.46 21.75,33 21.75,38.5 23.25,40 45.25,40 46.5,41.25 46.5,45 48.5,47 R53.1@52.045,47
SERVO_EXT_21: J27.2 R55.1 U15.3 | length 56.9
  Top Layer w0.2: U15.3@18.255,27.05 17.3,27.05 16.5,26.25 13.75,26.25 13.25,26.75 13.25,28.71 J27.2@14.54,30 16.25,30 20.5,34.25 20.5,39.25 22,40.75 44.75,40.75 45.75,41.75 45.75,45.25 48.25,47.75 R55.1@49.795,47.75
SERVO_EXT_22: J27.3 R57.1 U16.6 | length 93.8
  Top Layer w0.2: U16.6@20.745,56.95 20.75,56.955 20.75,58 19.583,59.167 9.917,59.167 8,57.25 8,34.5 8.75,33.75 13.33,33.75 J27.3@14.54,32.54 16.29,32.54 19.25,35.5 19.25,40 20.75,41.5 44.25,41.5 45,42.25 45,45.5 48,48.5 R57.1@52.045,48.5
SERVO_EXT_23: J28.1 R54.1 U16.5 | length 59
  Top Layer w0.2: U16.5@20.745,56 20,56 19.5,56.5 19.5,58 19,58.5 12,58.5 10.75,57.25 10.75,53.25 11.25,52.75 13.25,52.75 J28.1@14.54,51.46 16.29,51.46 20.75,47 45.5,47 47.75,49.25 R54.1@49.795,49.25
SERVO_EXT_24: J28.2 R56.1 U16.1 | length 49.9
  Top Layer w0.2: U16.1@18.255,56.95 17.3,56.95 16.5,57.75 13.75,57.75 13.25,57.25 13.25,55.29 J28.2@14.54,54 16.25,54 22,48.25 45.75,48.25 47.5,50 R56.1@52.045,50
SWCLK: J3.4 U5.49 U6.4 | length 31.7
  Top Layer w0.2: U5.49@70.8,64.25 71.75,64.25 v2(72.5,63.5) ; U6.4@93.4,61.553 94.407,61.553 J3.4@96.5,59.46
  Bottom Layer w0.2: v2(72.5,63.5) 92.46,63.5 J3.4@96.5,59.46
SWDIO: J3.3 U5.46 U6.1 | length 29.5
  Top Layer w0.2: v2(73.5,64.5) 73.5,64.566 73.75,64.816 U5.46@73.75,66.2 ; U6.1@93.4,63.452 95.048,63.452 J3.3@96.5,62
  Bottom Layer w0.2: v2(73.5,64.5) 94,64.5 J3.3@96.5,62
TXD0: J4.6 R31.1 U7.35 U8.3 | length 49
  Top Layer w0.2: U7.35@78.75,88.45 94.4,88.45 J4.6@96.5,86.35 96.5,86.25 97.75,85 97.75,83.25 96.953,82.452 93.225,82.452 93.15,82.377 U8.3@93.15,82.203 ; R31.1@82.25,72.205 v2(82.25,73.5)
  Bottom Layer w0.2: v2(82.25,73.5) 82.25,74.75 93.85,86.35 J4.6@96.5,86.35
pads on no net: H1.1 H2.1 H3.1 H4.1 J1.3 J1.4 U5.2 U5.3 U5.4 U5.8 U5.9 U5.11 U5.35 U5.36 U5.45 U5.54 U7.4 U7.5 U7.6 U7.7 U7.8 U7.9 U7.10 U7.16 U7.17 U7.18 U7.19 U7.20 U7.21 U7.22 U7.23 U7.32 U7.33 U7.36 U7.37 U7.39_10 U7.39_11 U7.39_12 U7.39_13 U7.39_14 U7.39_15 U7.39_16 U7.39_17 U7.39_18 U7.39_19 U7.39_20 U7.39_21 U13.5 U17.9 U17.10 U17.11
copper on no net:
  other v2: 74.25,46.5 75.25,46.5 73.5,47.25 76,47.25 72.75,48 76.75,48 72,48.75 77.5,48.75 71.25,49.5 77.5,49.75 70.5,50.25 76.75,50.5 69.75,51 76,51.25 70.5,51.75 76,52.25 72.25,52.5 73.25,52.5 74,53.25
  other v3: 70,55 71,56 84.75,67.5 86.5,69 56.75,90.25 57.75,90.25 58.75,90.25
  other v4: 38.5,29.5 38.5,30.75 38.5,32 38.5,33.25

## Polygon pours and split planes (outlines as drawn)
+3V3 on Top Layer "NONET_L-01_P-001" (solid, pour order 49): 37.25,15.25 ccw(c37.25,15.499) 37.5,15.5 37.5,24.25 37.5,34.5 cw(c38,34.5) 38,35 52.25,35 ccw(c52.25,35.5) 52.75,35.5 52.75,36.5 ccw(c52.254,36.5) 52.254,36.996 37.996,36.996 ccw(c37.995,34.501) 35.5,34.5 35.5,25.25 cw(c35,25.25) 35,24.75 32.5,24.75 ccw(c32.499,24.251) 32,24.25 32,15.5 ccw(c32.25,15.5) 32.25,15.25
+VBAT_LOGIC on Top Layer "NONET_L-01_P-001" (solid, pour order 48): 57,13.25 57,14.75 ccw(c55.751,14.75) 55.75,16 50.25,16 cw(c50.25,16.499) 49.75,16.5 49.75,26 ccw(c49.5,26) 49.5,26.25 48.75,26.25 ccw(c48.75,26) 48.5,26 48.5,24.75 cw(c48.25,24.75) 48.25,24.5 ccw(c48.25,24.25) 48,24.25 48,20.5 cw(c47.5,20.5) 47.5,20 43,20 cw(c43,20.5) 42.5,20.5 42.5,26 ccw(c42.25,26) 42.25,26.25 41.5,26.25 ccw(c41.5,26) 41.25,26 41.25,24.75 cw(c41,24.75) 41,24.5 ccw(c41,24.25) 40.75,24.25 40.75,18.75 ccw(c41.25,18.75) 41.25,18.25 46.25,18.25 cw(c46.25,17.75) 46.75,17.75 46.75,16.5 cw(c46.25,16.499) 46.25,16 45.8,16 43.9,16 ccw(c43.899,15.501) 43.4,15.5 43.4,14.6 cw(c43.001,14.599) 43,14.2 42.1,14.2 ccw(c42.099,14.101) 42,14.1 42,13.9 ccw(c42.1,13.9) 42.1,13.8 43.6,13.8 cw(c43.601,13.001) 44.4,13 44.4,12.5 ccw(c44.9,12.5) 44.9,12 55.75,12 ccw(c55.75,13.25)
+VBAT_SYS on Top Layer "+VBAT_SYS_L01_P038" (solid, pour order 38): 29.25,10.25 29.25,21.75 ccw(c28.75,21.75) 28.75,22.25 25.25,22.25 ccw(c25.25,21.75) 24.75,21.75 24.75,10.25 cw(c23.501,10.249) 23.5,9 15.5,9 cw(c15.5,10.25) 14.25,10.25 14.25,21.75 ccw(c13.75,21.75) 13.75,22.25 10.25,22.25 ccw(c10.25,21.75) 9.75,21.75 9.75,2.5 ccw(c11,2.5) 11,1.25 56.25,1.25 ccw(c56.125,2.125) 57,2.25 57,8.25 57,10.25 ccw(c55.75,10.25) 55.75,11.5 54.25,11.5 ccw(c54.25,10.25) 53,10.25 53,9.75 cw(c52.25,9.75) 52.25,9 30.5,9 cw(c30.5,10.25)
NetC8_1 on Top Layer "NONET_L-01_P-001" (solid, pour order 47): 41.5,14.4 41.5,15 ccw(c41.301,15.001) 41.3,15.2 38.2,15.2 ccw(c38.199,14.601) 37.6,14.6 cw(c37.001,14.599) 37,14 32.6,13.9 ccw(c32.6,13.3) 32,13.3 32,11.6 ccw(c32.6,11.6) 32.6,11 37.4,11 ccw(c37.4,11.8) 38.2,11.8 38.2,13.1 cw(c39.1,13.1) 39.1,14 39.7,14 ccw(c39.7,14.1) 39.8,14.1 cw(c40,14.1) 40,14.3 41.4,14.3 ccw(c41.4,14.4)
+VBAT_SYS on Top Layer "NONET_L-01_P-001" (solid, pour order 46): 24.75,39 cw(c25.25,39) 25.25,39.5 27.5,39.5 cw(c27.5,39) 28,39 28,36.25 cw(c27.5,36.25) 27.5,35.75 25.25,35.75 cw(c25.25,36.25) 24.75,36.25
+VBAT_SYS on Top Layer "NONET_L-01_P-001" (solid, pour order 45): 9.75,39 cw(c10.25,39) 10.25,39.5 12.5,39.5 cw(c12.5,39) 13,39 13,36.25 cw(c12.5,36.25) 12.5,35.75 10.25,35.75 cw(c10.25,36.25) 9.75,36.25
+VBAT_SYS on Top Layer "NONET_L-01_P-001" (solid, pour order 44): 24.75,63 cw(c25.25,63) 25.25,63.5 27.5,63.5 cw(c27.5,63) 28,63 28,60.25 cw(c27.5,60.25) 27.5,59.75 25.25,59.75 cw(c25.25,60.25) 24.75,60.25
+VBAT_SYS on Top Layer "NONET_L-01_P-001" (solid, pour order 43): 9.75,63 cw(c10.25,63) 10.25,63.5 12.5,63.5 cw(c12.5,63) 13,63 13,60.25 cw(c12.5,60.25) 12.5,59.75 10.25,59.75 cw(c10.25,60.25) 9.75,60.25
+VBAT_SYS on Top Layer "NONET_L-01_P-001" (solid, pour order 42): 9.75,87 cw(c10.25,87) 10.25,87.5 12.5,87.5 cw(c12.5,87) 13,87 13,84.25 cw(c12.5,84.25) 12.5,83.75 10.25,83.75 cw(c10.25,84.25) 9.75,84.25
+VBAT_SYS on Top Layer "NONET_L-01_P-001" (solid, pour order 41): 24.75,87 cw(c25.25,87) 25.25,87.5 27.5,87.5 cw(c27.5,87) 28,87 28,84.25 cw(c27.5,84.25) 27.5,83.75 25.25,83.75 cw(c25.25,84.25) 24.75,84.25
+VBAT_SYS on Top Layer "NONET_L-01_P-001" (solid, pour order 40): 39.75,87 cw(c40.25,87) 40.25,87.5 42.5,87.5 cw(c42.5,87) 43,87 43,84.25 cw(c42.5,84.25) 42.5,83.75 40.25,83.75 cw(c40.25,84.25) 39.75,84.25
+VBAT_SYS on Top Layer "NONET_L-01_P-001" (solid, pour order 26): 39.75,63 cw(c40.25,63) 40.25,63.5 42.5,63.5 cw(c42.5,63) 43,63 43,60.25 cw(c42.5,60.25) 42.5,59.75 40.25,59.75 cw(c40.25,60.25) 39.75,60.25
+VBAT_SYS on Top Layer "+VBAT_SYS_L01_P033" (solid, pour order 33): 25.25,70.25 ccw(c25.25,69.75) 24.75,69.75 24.75,66.25 ccw(c25.25,66.25) 25.25,65.75 28.75,65.75 ccw(c28.75,66.25) 29.25,66.25 29.25,69.75 ccw(c28.75,69.75) 28.75,70.25
+VBAT_SYS on Top Layer "+VBAT_SYS_L01_P032" (solid, pour order 32): 10.25,70.25 ccw(c10.25,69.75) 9.75,69.75 9.75,66.25 ccw(c10.25,66.25) 10.25,65.75 13.75,65.75 ccw(c13.75,66.25) 14.25,66.25 14.25,69.75 ccw(c13.75,69.75) 13.75,70.25
+VBAT_SYS on Top Layer "+VBAT_SYS_L01_P031" (solid, pour order 31): 10.25,46.25 ccw(c10.25,45.75) 9.75,45.75 9.75,42.25 ccw(c10.25,42.25) 10.25,41.75 13.75,41.75 ccw(c13.75,42.25) 14.25,42.25 14.25,45.75 ccw(c13.75,45.75) 13.75,46.25
+VBAT_SYS on Top Layer "+VBAT_SYS_L01_P030" (solid, pour order 30): 40.25,70.25 ccw(c40.25,69.75) 39.75,69.75 39.75,66.25 ccw(c40.25,66.25) 40.25,65.75 43.75,65.75 ccw(c43.75,66.25) 44.25,66.25 44.25,69.75 ccw(c43.75,69.75) 43.75,70.25
+VBAT_SYS on Top Layer "+VBAT_SYS_L01_P029" (solid, pour order 29): 40.25,46.25 ccw(c40.25,45.75) 39.75,45.75 39.75,42.25 ccw(c40.25,42.25) 40.25,41.75 43.75,41.75 ccw(c43.75,42.25) 44.25,42.25 44.25,45.75 ccw(c43.75,45.75) 43.75,46.25
+VBAT_SW on Top Layer "+VBAT_SW_L01_P000" (solid, pour order 0): 71.2,23.6 ccw(c70.801,23.6) 70.8,24 64,24 ccw(c63.999,23.601) 63.6,23.6 63.6,9.4 cw(c62.6,9.4) 62.6,8.4 61.4,8.4 ccw(c61.399,7.401) 60.4,7.4 60.4,2.6 ccw(c61.399,2.599) 61.4,1.6 69.4,1.6 ccw(c69.4,2.6) 70.4,2.6 70.4,11.6 cw(c70.8,11.6) 70.8,12 ccw(c70.8,12.4) 71.2,12.4
NetF1_1 on Top Layer "NETF1_1_L01_P009" (solid, pour order 9): 86.75,36 93.25,36 cw(c93.25,34.75) 94.5,34.75 94.5,15.75 cw(c93.25,15.75) 93.25,14.5 90.25,14.5 cw(c90.25,15.75) 89,15.75 89,29.75 ccw(c87.75,29.75) 87.75,31 86.75,31 cw(c86.75,32.25) 85.5,32.25 85.5,34.75 cw(c86.75,34.75)
+VBAT_F on Top Layer "+VBAT_F_L01_P010" (solid, pour order 10): 77.8,12 72.2,12 cw(c72.2,12.4) 71.8,12.4 71.8,15.8 cw(c72.2,15.8) 72.2,16.2 72.8,16.2 ccw(c72.8,16.4) 73,16.4 73,17.4 ccw(c72.801,17.4) 72.8,17.6 72.2,17.6 cw(c72.199,17.999) 71.8,18 71.8,21.8 cw(c72.2,21.8) 72.2,22.2 72.8,22.2 ccw(c72.8,22.6) 73.2,22.6 73.2,23.2 ccw(c72.8,23.2) 72.8,23.6 72.4,23.6 cw(c72.4,24) 72,24 72,28.6 cw(c72.4,28.6) 72.4,29 80.6,29 cw(c80.601,28.601) 81,28.6 81,12.5 cw(c80.5,12.5) 80.5,12
+VBAT_SYS on Top Layer "+VBAT_SYS_L01_P012" (solid, pour order 12): 25.25,46.25 ccw(c25.25,45.75) 24.75,45.75 24.75,42.25 ccw(c25.25,42.25) 25.25,41.75 28.75,41.75 ccw(c28.75,42.25) 29.25,42.25 29.25,45.75 ccw(c28.75,45.75) 28.75,46.25
+3V3 on Bottom Layer "+3V3_L04_P067" (solid, pour order 67): 52.533,35.3 52.533,34.8 52.75,34.8 cw(c52.95,34.8) 52.95,35 53.25,35 53.25,35.3
+3V3 on Bottom Layer "+3V3_L04_P066" (solid, pour order 66): 52.25,35 52.25,35.5 52.75,35.5 ccw(c52.95,35.5) 52.95,35.3 53.25,35.3 53.25,35
+3V3 on Bottom Layer "+3V3_L04_P065" (solid, pour order 65): 52.25,36.65 52.25,36.15 52.75,36.15 cw(c52.95,36.15) 52.95,36.35 53.25,36.35 53.25,36.65
+3V3 on Bottom Layer "+3V3_L04_P061" (solid, pour order 61): 52.25,36.35 52.25,36.85 52.75,36.85 ccw(c52.95,36.85) 52.95,36.65 53.25,36.65 53.25,36.35
+3V3 on Bottom Layer "+3V3_L04_P062" (solid, pour order 62): 52.75,36.5 52.25,36.5 52.25,37 ccw(c52.25,37.2) 52.45,37.2 52.45,37.5 52.75,37.5
+3V3 on Bottom Layer "+3V3_L04_P017" (solid, pour order 17): 52.75,35.5 52.05,35.5 52.05,35 52.25,35 cw(c52.25,34.8) 52.45,34.8 52.45,34.65 52.75,34.65
+3V3 on Bottom Layer "+3V3_L04_P053" (solid, pour order 53): 52.25,37 cw(c52.25,36.5) 52.75,36.5 52.75,35.5 cw(c52.25,35.5) 52.25,35 46.748,35 cw(c46.75,35.5) 46.25,35.5 46.25,36.5 cw(c46.75,36.5) 46.75,37
+VBAT_SYS on Bottom Layer "+VBAT_SYS_L04_P021" (solid, pour order 21): 29.25,10.25 29.25,21.75 ccw(c28.75,21.75) 28.75,22.25 25.25,22.25 ccw(c25.25,21.75) 24.75,21.75 24.75,10.25 cw(c23.501,10.249) 23.5,9 15.5,9 cw(c15.5,10.25) 14.25,10.25 14.25,21.75 ccw(c13.75,21.75) 13.75,22.25 10.25,22.25 ccw(c10.25,21.75) 9.75,21.75 9.75,2.5 ccw(c11,2.5) 11,1.25 56.25,1.25 ccw(c56.125,2.125) 57,2.25 57,8.25 ccw(c56.251,8.251) 56.25,9 45.5,9 cw(c45.5,10.25) 44.25,10.25 44.25,21.75 ccw(c43.75,21.75) 43.75,22.25 40.25,22.25 ccw(c40.25,21.75) 39.75,21.75 39.75,10.25 cw(c38.5,10.25) 38.5,9 30.5,9 cw(c30.5,10.25)
+VBAT_SYS on Bottom Layer "+VBAT_SYS_L04_P052" (solid, pour order 52): 14.25,82.5 14.25,87 ccw(c13.75,87) 13.75,87.5 10.25,87.5 ccw(c10.25,87) 9.75,87 9.75,82.5 ccw(c10.25,82.5) 10.25,82 cw(c10.25,81.5) 10.75,81.5 10.75,74.5 cw(c10.25,74.5) 10.25,74 ccw(c10.25,73.5) 9.75,73.5 9.75,58.5 ccw(c10.25,58.5) 10.25,58 cw(c10.25,57.5) 10.75,57.5 10.75,50.75 cw(c10.25,50.75) 10.25,50.25 ccw(c10.25,49.75) 9.75,49.75 9.75,34.5 ccw(c10.25,34.5) 10.25,34 cw(c10.25,33.5) 10.75,33.5 10.75,26.5 cw(c10.25,26.5) 10.25,26 ccw(c10.25,25.5) 9.75,25.5 9.75,18.25 ccw(c10.25,18.25) 10.25,17.75 13.75,17.75 ccw(c13.75,18.25) 14.25,18.25 14.25,25.5 ccw(c13.75,25.5) 13.75,26 cw(c13.75,26.5) 13.25,26.5 13.25,33.5 cw(c13.75,33.5) 13.75,34 ccw(c13.75,34.5) 14.25,34.5 14.25,49.75 ccw(c13.75,49.75) 13.75,50.25 cw(c13.75,50.75) 13.25,50.75 13.25,57.5 cw(c13.75,57.5) 13.75,58 ccw(c13.75,58.5) 14.25,58.5 14.25,73.5 ccw(c13.75,73.5) 13.75,74 cw(c13.75,74.5) 13.25,74.5 13.25,81.5 cw(c13.75,81.5) 13.75,82 ccw(c13.75,82.5)
+VBAT_SYS on Bottom Layer "+VBAT_SYS_L04_P034" (solid, pour order 34): 44.25,82.5 44.25,87 ccw(c43.75,87) 43.75,87.5 40.25,87.5 ccw(c40.249,87.001) 39.75,87 39.75,82.5 ccw(c40.25,82.5) 40.25,82 cw(c40.25,81.5) 40.75,81.5 40.75,74.5 cw(c40.25,74.5) 40.25,74 ccw(c40.25,73.5) 39.75,73.5 39.75,58.5 ccw(c40.25,58.5) 40.25,58 cw(c40.25,57.5) 40.75,57.5 40.75,50.75 cw(c40.25,50.75) 40.25,50.25 ccw(c40.25,49.75) 39.75,49.75 39.75,1.75 ccw(c40.25,1.75) 40.25,1.25 43.75,1.25 ccw(c43.75,1.75) 44.25,1.75 44.25,49.75 ccw(c43.75,49.75) 43.75,50.25 cw(c43.75,50.75) 43.25,50.75 43.25,57.5 cw(c43.75,57.5) 43.75,58 ccw(c43.75,58.5) 44.25,58.5 44.25,73.5 ccw(c43.75,73.5) 43.75,74 cw(c43.75,74.5) 43.25,74.5 43.25,81.5 cw(c43.75,81.5) 43.75,82 ccw(c43.75,82.5)
+VBAT_SYS on Bottom Layer "+VBAT_SYS_L04_P028" (solid, pour order 28): 29.25,82.5 29.25,87 ccw(c28.75,87) 28.75,87.5 25.25,87.5 ccw(c25.25,87) 24.75,87 24.75,82.5 ccw(c25.25,82.5) 25.25,82 cw(c25.25,81.5) 25.75,81.5 25.75,74.5 cw(c25.25,74.5) 25.25,74 ccw(c25.25,73.5) 24.75,73.5 24.75,58.5 ccw(c25.25,58.5) 25.25,58 cw(c25.25,57.5) 25.75,57.5 25.75,50.75 cw(c25.25,50.75) 25.25,50.25 ccw(c25.25,49.75) 24.75,49.75 24.75,34.5 ccw(c25.25,34.5) 25.25,34 cw(c25.25,33.5) 25.75,33.5 25.75,26.5 cw(c25.25,26.5) 25.25,26 ccw(c25.25,25.5) 24.75,25.5 24.75,1.75 ccw(c25.25,1.75) 25.25,1.25 28.75,1.25 ccw(c28.75,1.75) 29.25,1.75 29.25,25.5 ccw(c28.75,25.5) 28.75,26 cw(c28.75,26.5) 28.25,26.5 28.25,33.5 cw(c28.75,33.5) 28.75,34 ccw(c28.75,34.5) 29.25,34.5 29.25,49.75 ccw(c28.75,49.75) 28.75,50.25 cw(c28.75,50.75) 28.25,50.75 28.25,57.5 cw(c28.75,57.5) 28.75,58 ccw(c28.75,58.5) 29.25,58.5 29.25,73.5 ccw(c28.75,73.5) 28.75,74 cw(c28.75,74.5) 28.25,74.5 28.25,81.5 cw(c28.75,81.5) 28.75,82 ccw(c28.75,82.5)

## Silkscreen, mask and mechanical layers (free items; w line width, h text height)
Mechanical 1:
  the board outline again, w0.254

## Text inside footprints (layer, text, board x,y; h text height)
U7: Mechanical 13 "ANTENNA" at 64,96 h1.78